# Altium PCB Akilli_Sensor_Dugumu.PcbDoc
Units mm, origin at the board's own origin, x right, y up, seen from the top; angles counter-clockwise.
Board outline 57.15 x 68.7 mm, 2 copper layers (Top Layer, Bottom Layer); 32 components, 34 nets, 172 pads, 44 vias.
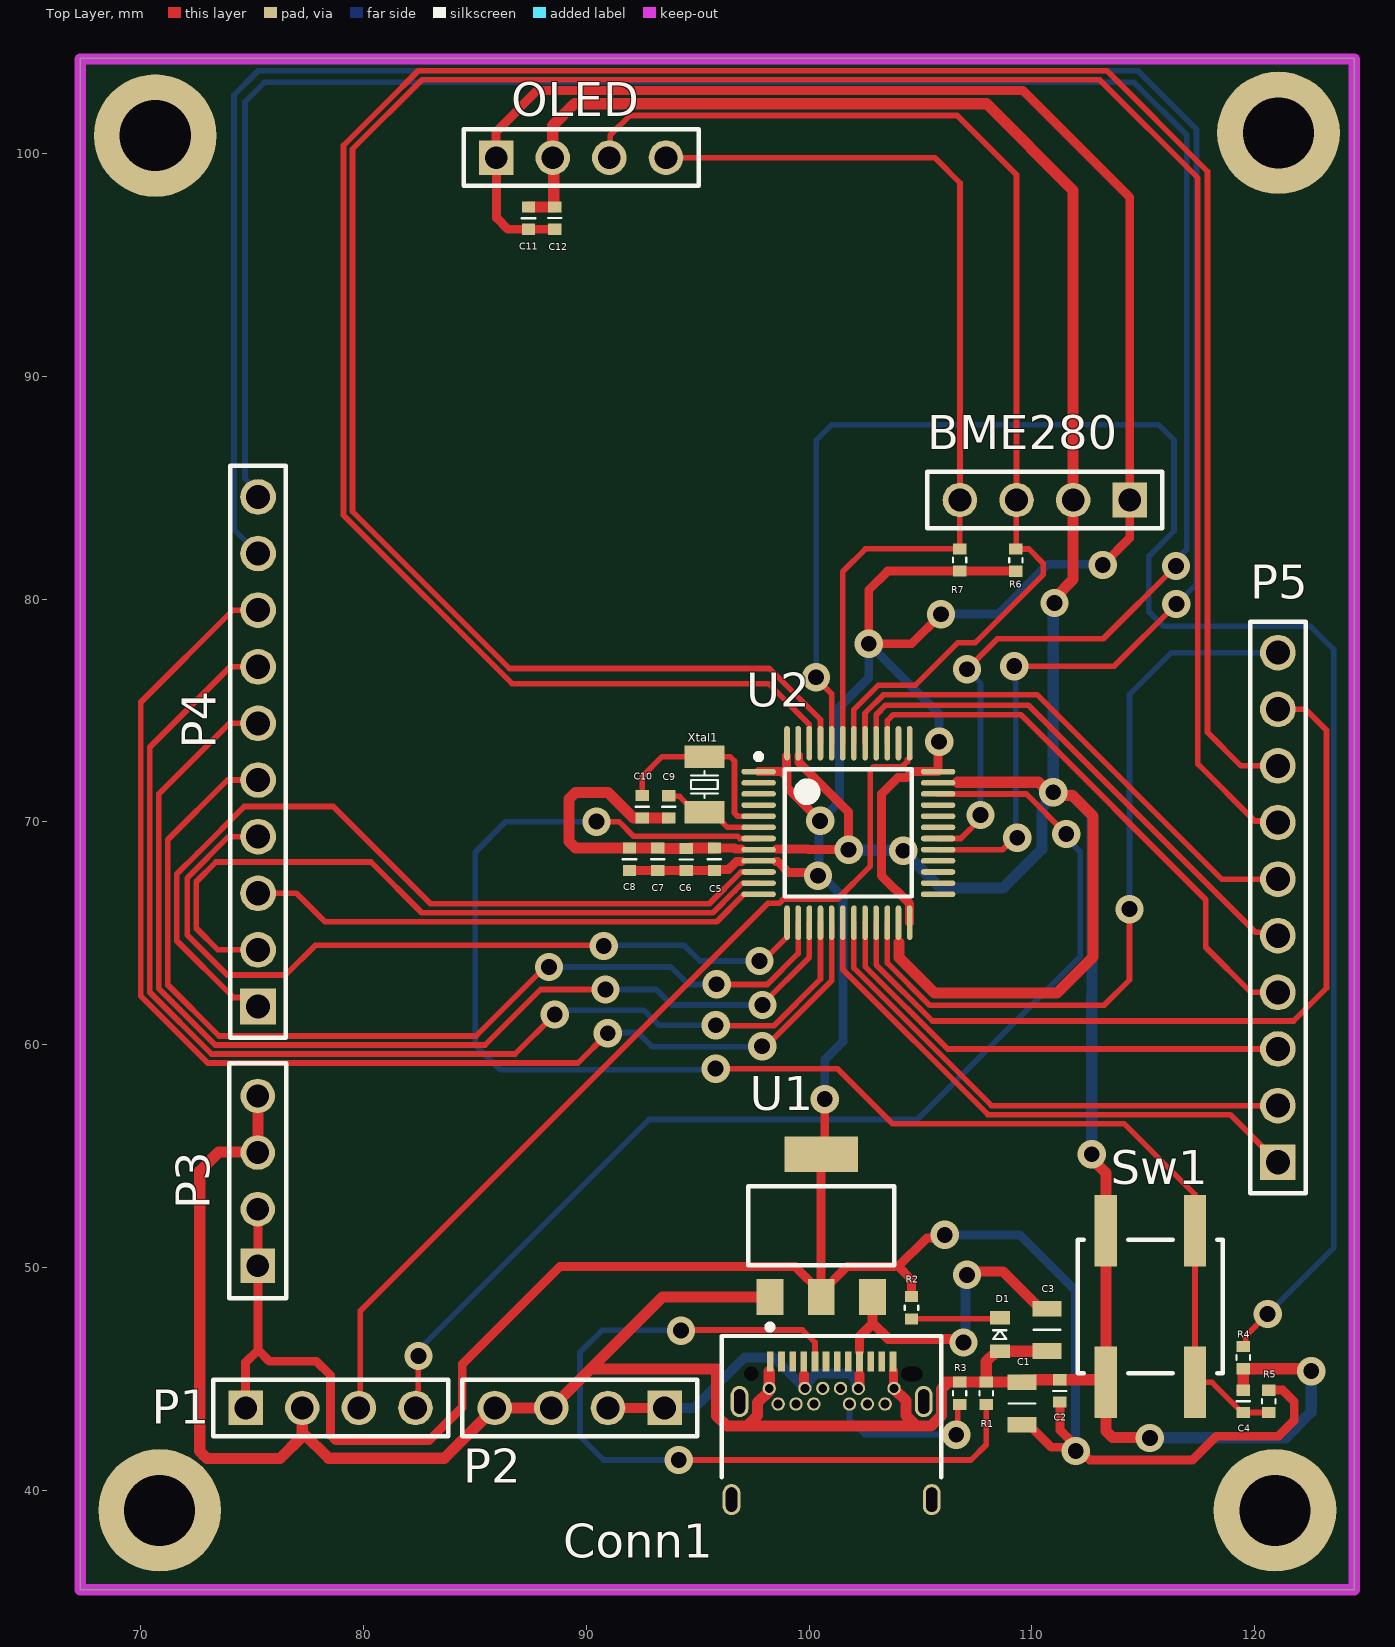
[diagram p0: Top Layer view]
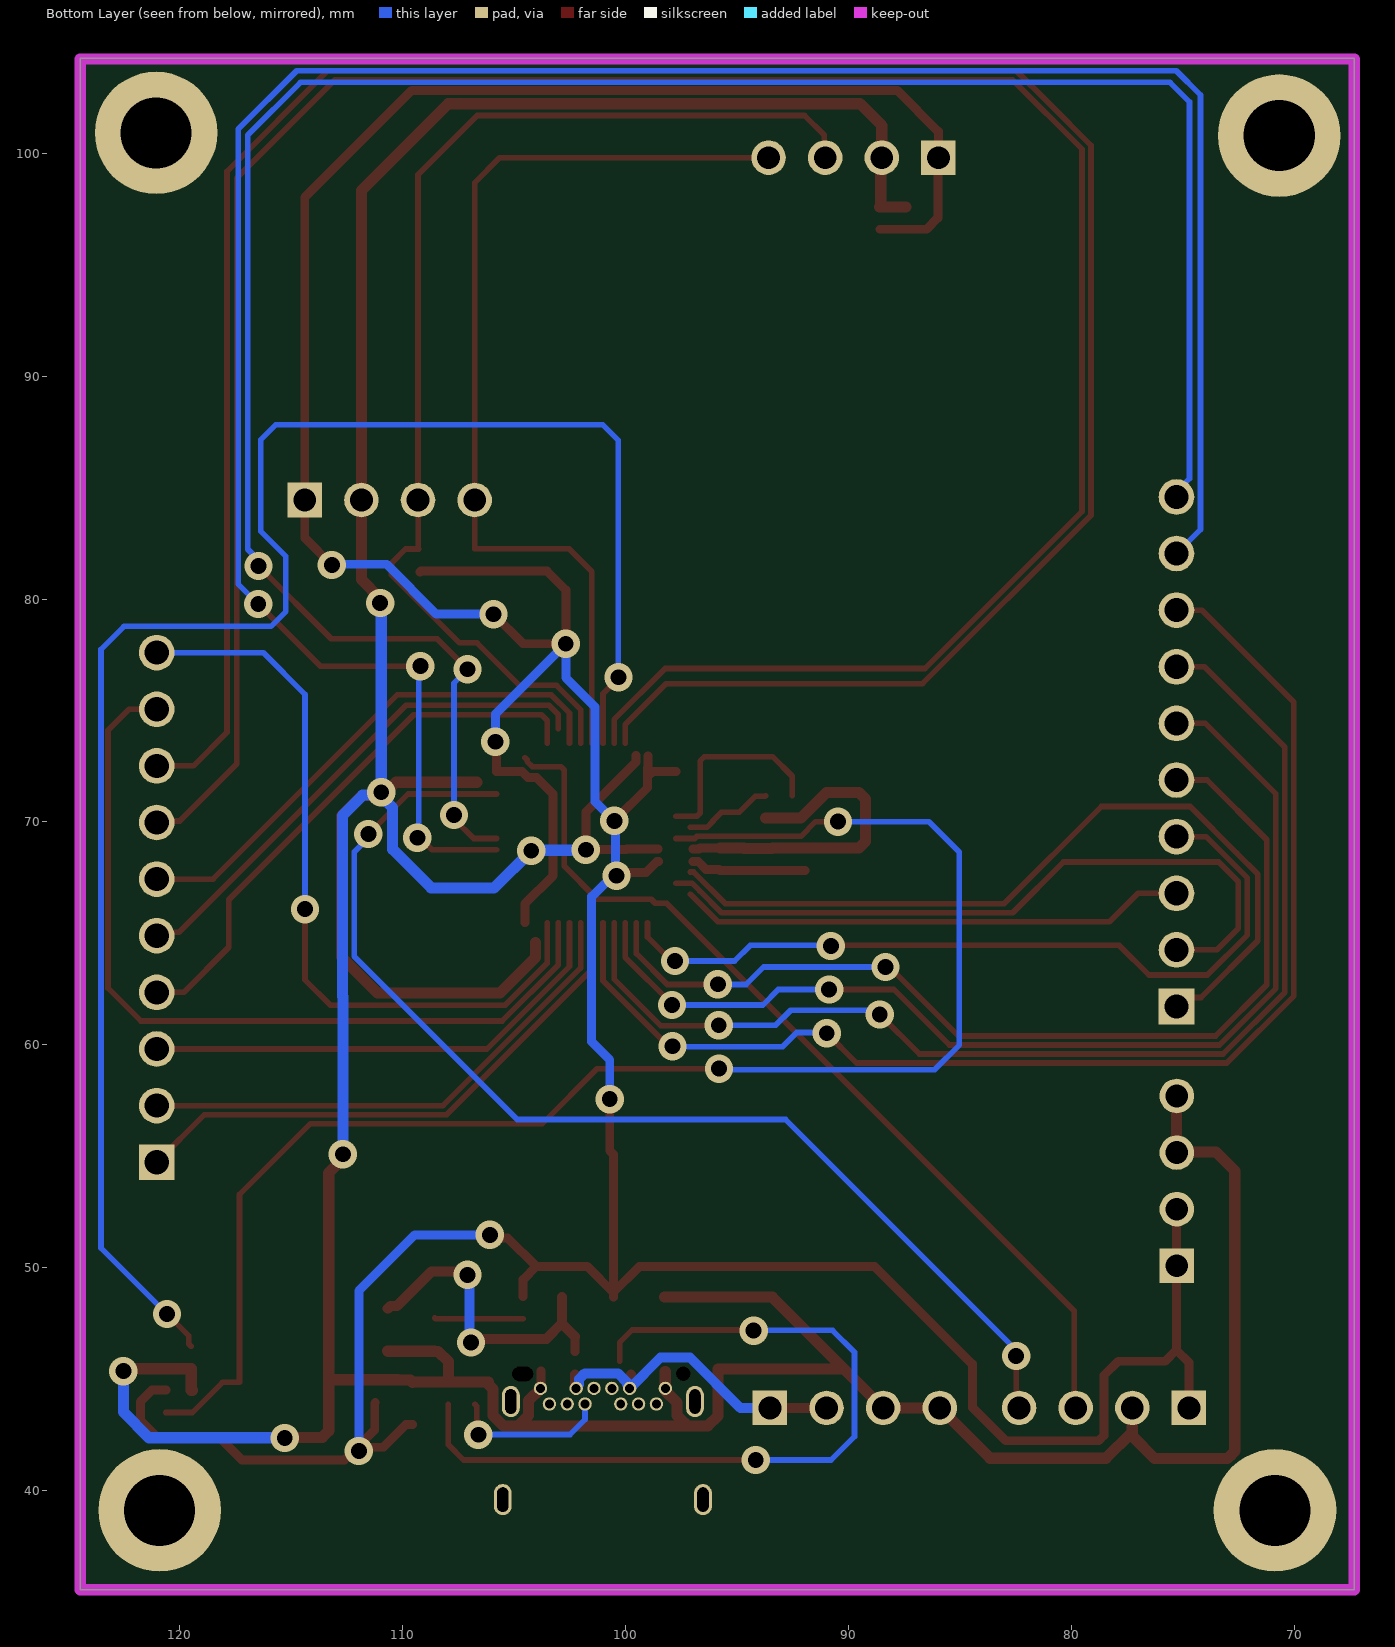
[diagram p1: Bottom Layer view, seen from below]
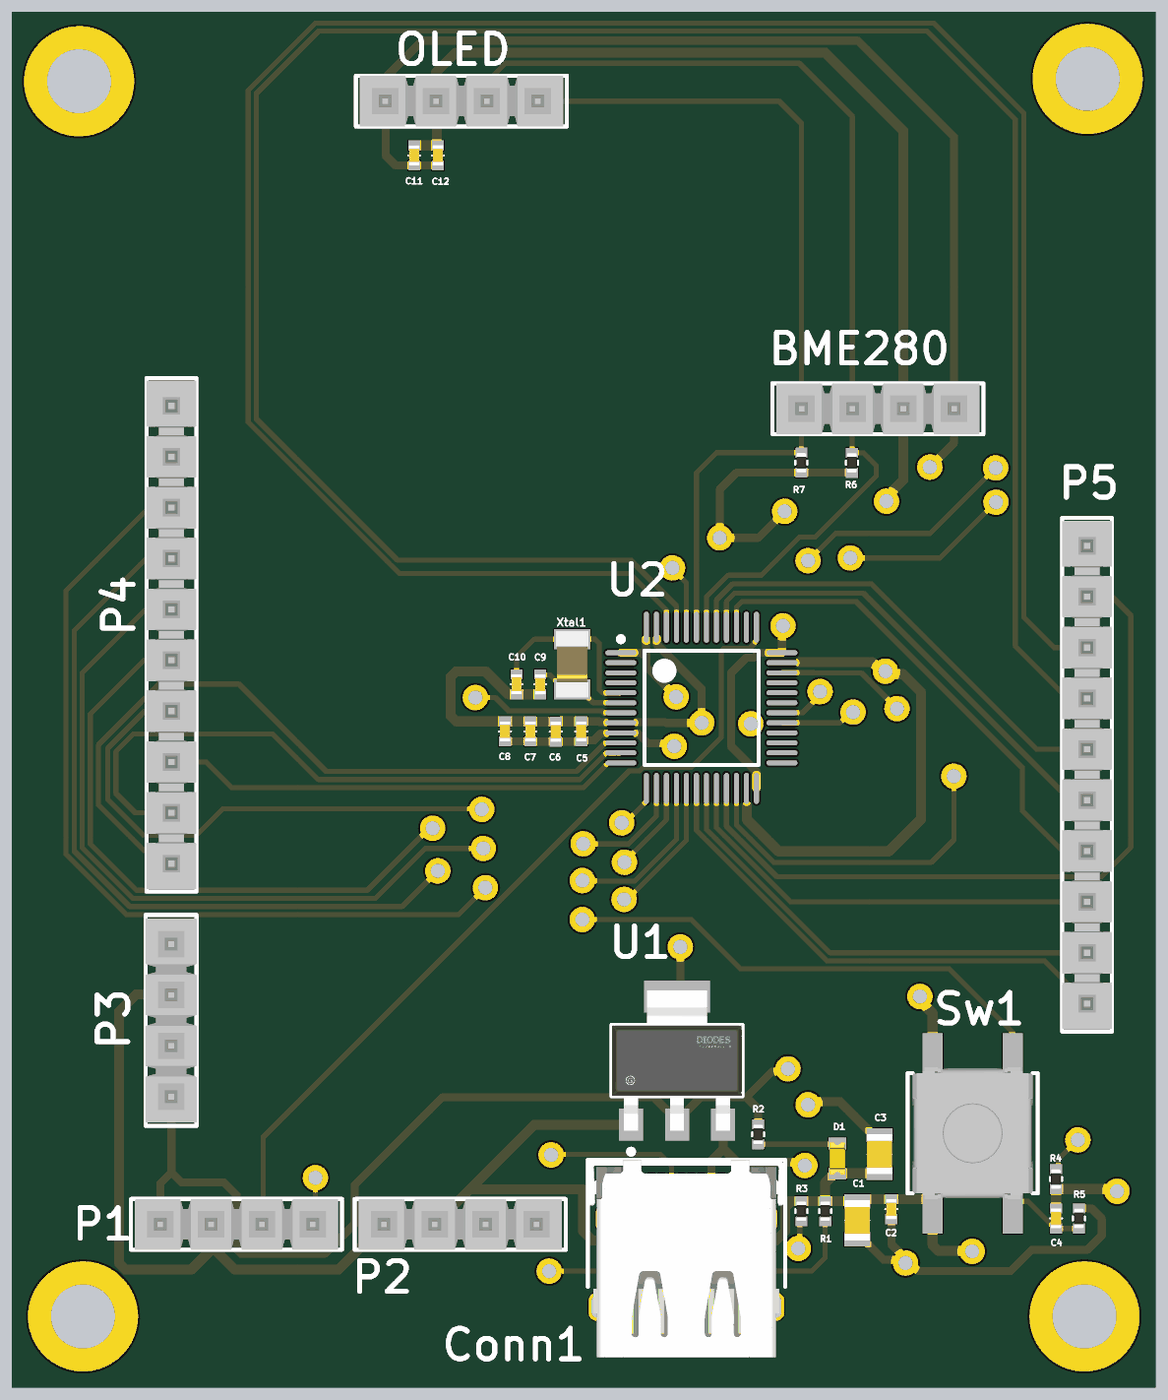
[diagram p2: 3D render of the assembled board from above, using the file's embedded part models]

## Layer stack, top to bottom
Top Solder: solder mask 0.0102, Solder Resist, Dk 3.5
Top Layer: signal copper 0.0356
Dielectric 1: dielectric 0.32, FR-4, Dk 4.8
Bottom Layer: signal copper 0.0356
Bottom Solder: solder mask 0.0102, Solder Resist, Dk 3.5

## Board outline
67.31,35.56 124.46,35.56 124.46,104.259 67.31,104.259

## Design rules (kind name [scope] priority, off if disabled: settings)
Clearance [All] p1: gap=0.15 ignorepadtopadclearanceinfootprint=TRUE
HoleSize [All] p1: absolutevalues=TRUE maxlimit=5 minlimit=0.025 maxpercent=80.000 minpercent=20.000
MinimumSolderMaskSliver [All] p1: minsoldermaskwidth=0.01
PolygonConnect [All] p1: connectstyle=Relief reliefconductorwidth=0.254 reliefentries=4 polygonreliefangle="90 Angle" airgapwidth=0.254
RoutingVias [All] p1: holewidth=0.711 width=1.27 viastyle="Through Hole" minholewidth=0.711 minwidth=1.27 maxholewidth=0.711 maxwidth=1.27
SilkToSolderMaskClearance [IsPad] p1: minsilkscreentomaskgap=0.1 clearancetoexposedcopper=TRUE
SolderMaskExpansion [All] p1: expansion=0.102 istentingtop=FALSE
SupplyNets "Schematic Supply Nets" [InNet('Gnd')] p1: voltage=0.000
Width [All] p1: maxlimit=0.5 minlimit=0.254 preferedwidth=0.254
27 further rules are at their usual default settings.

## Classes and differential pairs
component class 04_GPIO_Header: P2 P4
component class 03_Sensor_Display: BME280 C11 C12 R6 R7
component class 02_MCU: C4 C5 C6 C7 C8 C9 C10 P1 R4 R5 Sw1 U2 Xtal1
component class 01_Power: C1 C2 C3 Conn1 D1 R1 R2 R3

## Components (designator, comment, footprint, x,y, rotation, side; value= is the part's Value field where it differs from the comment)
BME280 "MTSW-104-07-G-S-170" SMTC-MTSW-104-07-X-S-170 114.39,84.444 r180 top
C1 "Capacitor_Ceramic" Capacitor_Ceramic_M2012_I0805 109.55,43.917 r90 top value=10uF
C2 "Capacitor_Ceramic" Capacitor_Ceramic_M1005_I0402 111.252,44.475 r90 top value=100nF
C3 "Capacitor_Ceramic" Capacitor_Ceramic_M2012_I0805 110.668,47.219 r270 top value=10uF
C4 "Capacitor_Ceramic" Capacitor_Ceramic_M1005_I0402 119.482,44.01 r90 top value=100nF
C5 "Capacitor_Ceramic" Capacitor_Ceramic_M1005_I0402 95.758,68.326 r90 top value=100nF
C6 "Capacitor_Ceramic" Capacitor_Ceramic_M1005_I0402 94.488,68.318 r90 top value=100nF
C7 "Capacitor_Ceramic" Capacitor_Ceramic_M1005_I0402 93.218,68.326 r90 top value=100nF
C8 "Capacitor_Ceramic" Capacitor_Ceramic_M1005_I0402 91.948,68.326 r90 top value=100nF
C9 "Capacitor_Ceramic" Capacitor_Ceramic_M1005_I0402 93.711,70.679 r270 top value=22pF
C10 "Capacitor_Ceramic" Capacitor_Ceramic_M1005_I0402 92.525,70.683 r270 top value=22pF
C11 "Capacitor_Ceramic" Capacitor_Ceramic_M1005_I0402 87.415,97.089 r90 top value=100nF
C12 "Capacitor_Ceramic" Capacitor_Ceramic_M1005_I0402 88.598,97.092 r90 top value=100nF
Conn1 "GCT, USB4056" "GCT, USB4056" 101.016,39.601 r0 top
D1 "Diode_Led" Diode_Smd_M1608_I0603_Green-Yellow 108.56,47.002 r90 top
OLED "MTSW-104-07-G-S-170" SMTC-MTSW-104-07-X-S-170 85.965,99.803 r0 top (schematic designator BME280)
P1 "MTSW-104-07-G-S-170" SMTC-MTSW-104-07-X-S-170 74.727,43.713 r0 top
P2 "MTSW-104-07-G-S-170" SMTC-MTSW-104-07-X-S-170 93.523,43.713 r180 top
P3 "MTSW-104-07-G-S-170" SMTC-MTSW-104-07-X-S-170 75.27,50.088 r90 top
P4 "PHT-110-01-L-S" SMTC-PHT-110-01-X-S 75.286,61.722 r90 top
P5 "PHT-110-01-L-S" SMTC-PHT-110-01-X-S 121.031,54.737 r90 top
R1 "Resistor" Resistor_Smd_M1005_I0402 107.95,44.374 r90 top value=4.87K
R2 "Resistor" Resistor_Smd_M1005_I0402 104.597,48.209 r270 top value=330R
R3 "Resistor" Resistor_Smd_M1005_I0402 106.756,44.374 r90 top value=4.87K
R4 "Resistor" Resistor_Smd_M1005_I0402 119.482,45.974 r270 top value=10K
R5 "Resistor" Resistor_Smd_M1005_I0402 120.625,44.01 r90 top value=10K
R6 "Resistor" Resistor_Smd_M1005_I0402 109.282,81.745 r90 top value=4.87K
R7 "Resistor" Resistor_Smd_M1005_I0402 106.755,81.752 r90 top value=4.87K
Sw1 "Tactile, SPST" "Tactile, SPST - Panasonic, EVQQ2" 115.316,48.26 r90 top
U1 "AZ1117CH-3.3TRG1" FP-SOT223-MFG 100.547,51.892 r90 top
U2 "STM32F103C8T6" STM-LQFP48_L 101.764,69.508 r0 top
Xtal1 "Crystal" "NDK, NX3215SA" 95.307,71.681 r90 top

## Footprints (in the part's own frame and the unit in brackets; to place one, negate y for a bottom-side part, rotate by r counter-clockwise, add the part's x,y. Pads: shape width x height; smd on the part's side, far side on the other; paste and mask are expansions set on the pad)
Capacitor_Ceramic_M1005_I0402 [mm] "Capacitor_Ceramic_M1005_I0402"
  rect 0.5x0.6 smd mask+0.05: 1(-0.5,0) 2(0.5,0)
  silkscreen extent 0,-0.3 0,0.3, body extent -0.6,-0.26 0.6,0.26, height 0.51
Capacitor_Ceramic_M2012_I0805 [mm] "Capacitor_Ceramic_M2012_I0805"
  rect 0.7x1.3 smd mask+0.05: 1(-0.95,0) 2(0.95,0)
  silkscreen extent 0,-0.6 0,0.6, body extent -1.09,-0.64 1.09,0.64, height 1.26
Diode_Smd_M1608_I0603_Green-Yellow [mm] "Diode_Smd_M1608_I0603_Green-Yellow"
  rect 0.6x0.9 smd mask+0.05: A(-0.75,0) C(0.75,0)
  silkscreen extent -0.2,-0.3 0.2,0.3, body extent -0.8,-0.4 0.8,0.4, height 0.7
FP-SOT223-MFG [mm]
  rect 1.6x1.2 smd paste+0 mask+0: 1(-3.2,2.3) 2(-3.2,0) 3(-3.2,-2.3)
  rect 1.6x3.3 smd paste+0 mask+0: 4(3.2,0)
  silkscreen extent -4.67,-3.27 1.78,3.27, body extent -4.1,-3.37 4.1,3.37, height 0.25
"GCT, USB4056" [mm] "GCT, USB4056"
  rect 0.3x0.9 smd mask+0.05: A1(-2.75,6.2) A2(-2.25,6.2) A3(-1.75,6.2) A4(-1.25,6.2) A5(-0.75,6.2) A6(-0.25,6.2) A7(0.25,6.2) A8(0.75,6.2) A9(1.25,6.2) A10(1.75,6.2) A11(2.25,6.2) A12(2.75,6.2)
  round 0.6 hole 0.4 mask+0.05: B1(2.8,4.99) B2(2.4,4.29) B3(1.6,4.29) B4(1.2,4.99) B5(0.8,4.29) B6(0.4,4.99) B7(-0.4,4.99) B8(-0.8,4.29) B9(-1.2,4.99) B10(-1.6,4.29) B11(-2.4,4.29) B12(-2.8,4.99)
  round 0 hole 0.65 unplated mask+0.05: Hole1(-3.6,5.64)
  round 0 hole 0.65 slot 0.95 at 0 deg unplated mask+0.05: Hole2(3.6,5.64)
  oval 0.8x1.4 hole 0.5 slot 1.1 at 90 deg mask+0.05: Shell1(-4.13,4.4) Shell2(4.13,4.4) Shell3(-4.49,0) Shell4(4.49,0)
  silkscreen extent -4.92,1 4.92,7.34, body extent -4.93,-2.52 4.92,7.35, height 3.33
"NDK, NX3215SA" [mm] "NDK, NX3215SA"
  rect 1x1.8 smd mask+0.05: 1(-1.25,0) 2(1.25,0)
  silkscreen extent -0.6,-0.6 0.6,0.6, body extent -1.65,-0.8 1.65,0.8, height 0.89
Resistor_Smd_M1005_I0402 [mm] "Resistor_Smd_M1005_I0402"
  rect 0.5x0.6 smd mask+0.05: 1(-0.5,0) 2(0.5,0)
  silkscreen extent -0.1,-0.3 0.1,0.3, body extent -0.5,-0.26 0.5,0.26, height 0.4
SMTC-MTSW-104-07-X-S-170 [mm] "Assembly .025\" [.64] SQ Post Terminal Strip, 1x4 Pins, Vertical, 2.54mm Pitch, Male"
  rect 1.55x1.55 hole 1.02: 1(0,0)
  round 1.55 hole 1.02: 2(2.54,0) 3(5.08,0) 4(7.62,0)
  silkscreen extent -1.46,-1.27 9.08,1.27, body extent -1.27,-1.27 8.89,1.27, height 6.86
SMTC-PHT-110-01-X-S [mm] "Press Fit Socket Assembly, 1x10 Pins, Vertical, 2.54mm Pitch, Male"
  rect 1.6x1.6 hole 1.081: 1(0,0)
  round 1.6 hole 1.081: 2(2.54,0) 3(5.08,0) 4(7.62,0) 5(10.16,0) 6(12.7,0) 7(15.24,0) 8(17.78,0) 9(20.32,0) 10(22.86,0)
  silkscreen extent -1.4,-1.24 24.26,1.24, body extent -1.26,-1.25 24.12,1.25, height 8.38
STM-LQFP48_L [mm] "QFP, 48-Leads, Body 7x7mm, Pitch 0.5mm, IPC High Density"
  oval 1.55x0.25 smd: 1(-4.025,2.75) 2(-4.025,2.25) 3(-4.025,1.75) 4(-4.025,1.25) 5(-4.025,0.75) 6(-4.025,0.25) 7(-4.025,-0.25) 8(-4.025,-0.75) 9(-4.025,-1.25) 10(-4.025,-1.75) 11(-4.025,-2.25) 12(-4.025,-2.75) 25(4.025,-2.75) 26(4.025,-2.25) 27(4.025,-1.75) 28(4.025,-1.25) 29(4.025,-0.75) 30(4.025,-0.25) 31(4.025,0.25) 32(4.025,0.75) 33(4.025,1.25) 34(4.025,1.75) 35(4.025,2.25) 36(4.025,2.75)
  oval 0.25x1.55 smd: 13(-2.75,-4.025) 14(-2.25,-4.025) 15(-1.75,-4.025) 16(-1.25,-4.025) 17(-0.75,-4.025) 18(-0.25,-4.025) 19(0.25,-4.025) 20(0.75,-4.025) 21(1.25,-4.025) 22(1.75,-4.025) 23(2.25,-4.025) 24(2.75,-4.025) 37(2.75,4.025) 38(2.25,4.025) 39(1.75,4.025) 40(1.25,4.025) 41(0.75,4.025) 42(0.25,4.025) 43(-0.25,4.025) 44(-0.75,4.025) 45(-1.25,4.025) 46(-1.75,4.025) 47(-2.25,4.025) 48(-2.75,4.025)
  silkscreen extent -4.15,-2.85 2.85,3.55, body extent -3.5,-3.5 3.5,3.5, height 1.6
"Tactile, SPST - Panasonic, EVQQ2" [mm] "Tactile, SPST - Panasonic, EVQQ2"
  rect 3.2x1 smd mask+0.05: A(-3.4,-2) A(3.4,-2) B(-3.4,2) B(3.4,2)
  silkscreen extent -3,-3.25 3,3.25, body extent -3.3,-3 3.3,3, height 3.1

## Part data
BME280 OLED P1 P2 P3: library part CMP-1024-00104-1, "Modified .025\" SQ Post Header, Through-hole, Vertical, -55 to 125 degC, 2.54 mm Pitch, 4-Pin, Male, RoHS", Manufacturer=Samtec, Temperature Range="-55 to 125 degC", ComponentLink1Description="Manufacturer URL", ComponentLink1URL=http://www.samtec.com, ComponentLink2Description=Datasheet, ComponentLink2URL=http://www.samtec.com/documents/webfiles/pdf/MTSW.PDF, ComponentLink3Description="Package Specification", ComponentLink3URL=http://www.samtec.com/documents/webfiles/cpdf/MTSW-XXX-XX-X-X-XXXX-XX-XXX-MKT1.pdf, DatasheetVersion=F-214, Mounting Technology=Through-hole, Orientation=Vertical, PackageDescription="Assembly .025\" [.64] SQ Post Terminal Strip", PackageReference=MTSW-104-07-X-S-170, PackageVersion="BI, 2/1987", PartNumber=MTSW-104-07-G-S-170, Pitch="2.54 mm", RoHS=True
C1 C3: "Cap, Cer, 10uF, 6.3V, M2012", Manufacturer=Samsung, Manufacturer Part Number=CL21A106MQFNNNE, Operating Temperature, Max=-55℃, Operating Temperature, Min=+85℃, Package=M2012, Supplier Part Number=1276-1298-1-ND, Temperature Coefficient=X5R, Tolerance=20%, Voltage=6.3V, Component Category=Capacitor, Component Type=Ceramic, ComponentLink1Description=Datasheet, ComponentLink1URL="E:\Altium\Datasheets\Capacitor\Samsung - Multi Layer Ceramic Capacitors.pdf", ComponentLink2Description="Supplier Link", ComponentLink2URL=https://www.digikey.com/en/products/detail/samsung-electro-mechanics/CL21A106MQFNNNE/3886956, Price, Max=0.0087, Price, Min=0.1, Quantity, Max=200000, Quantity, Min=1, Supplier=Digikey, Supplier Currency=$, Supplier Link=https://www.digikey.com/en/products/detail/samsung-electro-mechanics/CL21A106MQFNNNE/3886956
C2 C4 C5 C6 C7 C8 C11 C12: "Cap, Cer, 100nF, 6.3V, M1005", Manufacturer=Kyocera, Manufacturer Part Number=04026D104KAT4A, Operating Temperature, Max=-55℃, Operating Temperature, Min=+85℃, Package=M1005, Supplier Part Number=478-11504-1-ND, Temperature Coefficient=X5R, Tolerance=10%, Voltage=6.3V, Component Category=Capacitor, Component Type=Ceramic, ComponentLink1Description=Datasheet, ComponentLink1URL="E:\Altium\Datasheets\Capacitor\Kyocera - X5R.pdf", ComponentLink2Description="Supplier Link", ComponentLink2URL=https://www.digikey.com/en/products/detail/kyocera-avx/04026D104KAT4A/8107673, Price, Max=0.00189, Price, Min=0.1, Quantity, Max=250000, Quantity, Min=1, Supplier=Digikey, Supplier Currency=$, Supplier Link=https://www.digikey.com/en/products/detail/kyocera-avx/04026D104KAT4A/8107673
C9 C10: "Cap, Cer, 22pF, 25V, M1005", Manufacturer=Walsin, Manufacturer Part Number=0402N220J250CT, Operating Temperature, Max=-55℃, Operating Temperature, Min=+125℃, Package=M1005, Supplier Part Number=1292-1282-1-ND, Temperature Coefficient="C0G, NP0", Tolerance=5%, Voltage=25V, Component Category=Capacitor, Component Type=Ceramic, ComponentLink1Description=Datasheet, ComponentLink1URL="E:\Altium\Datasheets\Capacitor\Walsin - Multilayer Ceramic Capacitors.pdf", ComponentLink2Description="Supplier Link", ComponentLink2URL=https://www.digikey.com/en/products/detail/walsin-technology-corporation/0402N220J250CT/9354779, Price, Max=0.00177, Price, Min=0.1, Quantity, Max=250000, Quantity, Min=1, Supplier=Digikey, Supplier Currency=$, Supplier Link=https://www.digikey.com/en/products/detail/walsin-technology-corporation/0402N220J250CT/9354779
Conn1: "Conn, USB, TYPE-C", Manufacturer=GCT, Manufacturer Part Number=USB4056-03-A, Operating Temperature, Max=+85℃, Operating Temperature, Min=-25℃, Package="TH+SMT, Side", Supplier Part Number=2073-USB4056-03-ACT-ND, Component Category=Connector, Component Type=USB, ComponentLink1Description=Datasheet, ComponentLink1URL="E:\Altium\Datasheets\Connector - USB\GCT, USB4056.pdf", ComponentLink2Description="Supplier Link", ComponentLink2URL=https://www.digikey.com/en/products/detail/gct/USB4056-03-A/14638038, Price, Max=0.44463, Price, Min=0.97, Quantity, Max=10000, Quantity, Min=1, Supplier=Digikey, Supplier Currency=$, Supplier Link=https://www.digikey.com/en/products/detail/gct/USB4056-03-A/14638038
D1: "Diode, Led, Green-Yellow, 2.2V, 20mA, M1608", Current=20mA, Manufacturer=Rohm, Manufacturer Part Number=SML-D12M1WT86, Operating Temperature, Max=+85℃, Operating Temperature, Min=-40℃, Package=M1608, Supplier Part Number=SML-D12M1WT86CT-ND, Voltage=2.2V, Component Category=Diode, Component Type=Led, ComponentLink1Description=Datasheet, ComponentLink1URL="E:\Altium\Datasheets\Diode\Rohm, SML-D12x1 Series.pdf", ComponentLink2Description="Supplier Link", ComponentLink2URL=https://www.digikey.com/en/products/detail/rohm-semiconductor/SML-D12M1WT86/5843856, Price, Max=0.02838, Price, Min=0.25, Quantity, Max=75000, Quantity, Min=1, Supplier=Digikey, Supplier Currency=$, Supplier Link=https://www.digikey.com/en/products/detail/rohm-semiconductor/SML-D12M1WT86/5843856
P4 P5: library part CMP-1024-00195-1, "Press Fit Header, Through-hole, Vertical, -55 to 125 degC, 2.54 mm Pitch, 10-Pin, Male, RoHS", Manufacturer=Samtec, Temperature Range="-55 to 125 degC", ComponentLink1Description="Manufacturer URL", ComponentLink1URL=http://www.samtec.com, ComponentLink2Description=Datasheet, ComponentLink2URL=http://www.samtec.com/documents/webfiles/pdf/pht.pdf, ComponentLink3Description="Package Specification", ComponentLink3URL=http://www.samtec.com/documents/webfiles/cpdf/PHT-1XX-XX-X-X-XXX-MKT.pdf, DatasheetVersion=F-214, Mounting Technology=Through-hole, Orientation=Vertical, PackageDescription=".100 Press Fit Socket Assembly", PackageReference=PHT-110-01-X-S, PackageVersion="J, 9/2009", PartNumber=PHT-110-01-L-S, Pitch="2.54 mm", RoHS=True
R1 R3 R6 R7: "Res, 4.87K, 1%, M1005", Manufacturer=Yageo, Manufacturer Part Number=RC0402FR-074K87L, Operating Temperature, Max=-55℃, Operating Temperature, Min=+155℃, Package=M1005, Supplier Part Number=YAG3175CT-ND, Tolerance=1%, Component Category=Resistor, Component Type="Fixed Value", ComponentLink1Description=Datasheet, ComponentLink1URL="E:\Altium\Datasheets\Resistor\Yageo - RC_L Series.pdf", ComponentLink2Description="Supplier Link", ComponentLink2URL=https://www.digikey.com/en/products/detail/yageo/RC0402FR-074K87L/5281035, Price, Max=0.00129, Price, Min=0.1, Quantity, Max=100000, Quantity, Min=1, Supplier=Digikey, Supplier Currency=$, Supplier Link=https://www.digikey.com/en/products/detail/yageo/RC0402FR-074K87L/5281035
R2: "Res, 330R, 1%, M1005", Manufacturer=Yageo, Manufacturer Part Number=RC0402FR-07330RL, Operating Temperature, Max=-55℃, Operating Temperature, Min=+155℃, Package=M1005, Supplier Part Number=311-330LRCT-ND, Tolerance=1%, Component Category=Resistor, Component Type="Fixed Value", ComponentLink1Description=Datasheet, ComponentLink1URL="E:\Altium\Datasheets\Resistor\Yageo - RC_L Series.pdf", ComponentLink2Description="Supplier Link", ComponentLink2URL=https://www.digikey.com/en/products/detail/yageo/RC0402FR-07330RL/726594, Price, Max=0.00129, Price, Min=0.1, Quantity, Max=100000, Quantity, Min=1, Supplier=Digikey, Supplier Currency=$, Supplier Link=https://www.digikey.com/en/products/detail/yageo/RC0402FR-07330RL/726594
R4 R5: "Res, 10K, 1%, M1005", Manufacturer=Yageo, Manufacturer Part Number=RC0402FR-0710KP, Operating Temperature, Max=-55℃, Operating Temperature, Min=+155℃, Package=M1005, Supplier Part Number=YAG1249CT-ND, Tolerance=1%, Component Category=Resistor, Component Type="Fixed Value", ComponentLink1Description=Datasheet, ComponentLink1URL="E:\Altium\Datasheets\Resistor\Yageo - RC_L Series.pdf", ComponentLink2Description="Supplier Link", ComponentLink2URL=https://www.digikey.com/en/products/detail/yageo/RC0402FR-0710KP/4935264, Price, Max=0.00282, Price, Min=0.1, Quantity, Max=100000, Quantity, Min=1, Supplier=Digikey, Supplier Currency=$, Supplier Link=https://www.digikey.com/en/products/detail/yageo/RC0402FR-0710KP/4935264
Sw1 Xtal1: "*", Operating Temperature, Max=+*℃, Operating Temperature, Min=-*℃, ComponentLink1Description=Datasheet, ComponentLink2Description="Supplier Link"
  Sw1: Component Category=Switch, Component Type=Tactile
  Xtal1: Component Category=Crystal, Component Type=Crystal
U1: library part CMP-12756-000028-1, "IC REG LINEAR 3.3V 800MA SOT223", Case/Package=SOT-223, Dropout Voltage=1.2V, Max Operating Temperature=125°C, Max Output Current=1.35A, Max Input Voltage=15V, Min Current Limit=1A, Min Operating Temperature=-20°C, Output Current=800mA, Output Voltage=3.3V, Package Quantity=4000, Power Supply Rejection Ratio (PSRR)=70dB, Quiescent Current=6mA, Reference Voltage=1.262V, Accuracy=1%, Height=1.7mm, Lead Free="Lead Free", Length=6.7mm, Mount="Surface Mount", Number of Outputs=1, Number of Pins=4, Number of Regulators=1, Output Type=Fixed, Packaging="Tape and Reel", Polarity=Positive, Width=3.7mm
U2: library part CMP-0237-00215-3, "ARM Cortex-M3 32-bit MCU, 64 KB Flash, 20 KB Internal RAM, 37 I/Os, 48-pin LQFP, -40 to 85 degC, Tray", Operating Frequency(F) (Processor speed) (MHz)=72, Supply Voltage(Vcc) min (V)=2, I/Os (High Current)=37, A/D Converter="2x12-bit (10 Channel)", ComponentLink1Description="Manufacturer URL", ComponentLink1URL=http://www.st.com/web/en/home.html, ComponentLink2Description=Datasheet, ComponentLink2URL=http://www.st.com/st-web-ui/static/active/en/resource/technical/document/datasheet/CD00161566.pdf, ComponentLink3Description="Package Specification", ComponentLink3URL=http://www.st.com/st-web-ui/static/active/en/resource/technical/document/datasheet/DM00058181.pdf, Core="ARM Cortex-M3", DatasheetVersion="Rev. 16", FLASH Size (Prog) (kB)=64, Mounting Technology="Surface Mount", PackageDescription="48-Pin Low Profile Quad Flat Package, 7 x 7 mm Body, 0.5 mm Pitch", PackageReference=LQFP48, PackageVersion="Rev. 6, 06/2013", Packing=Tray, PartNumber=STM32F103C8T6, Internal RAM Size (kB)=20

## Free pads (board coordinates)
  round 5.5 hole 3.2 unplated: 1(70.672,100.794) 2(70.866,39.116) 3(121.062,100.911) 4(120.904,39.116)

## Via types
v1: diameter 1.27, hole 0.711, Top Layer to Bottom Layer, 44 vias

## Nets (pads, with @x,y where several pads share a name; then routed paths per layer and width w, separated by ;. In a path a pad name is that pad's centre, name@x,y a point inside that pad or via, vN(x,y) a via of type N, cw(c..) or ccw(c..) an arc to the next point about the centre after c; other vN are vias at no path point)
3V3: BME280.1 C1.1 C2.1 C5.1 C6.1 C7.1 C8.1 C11.1 C12.1 OLED.1 P1.1 P3.1 P3.2 R2.1 R5.2 R6.1 R7.1 U1.2 U1.4 U2.1 U2.9 U2.24 U2.36 U2.48 | length 218.7
  Top Layer w0.4: P1.1 74.727,45.755 75.286,46.313 ; P3.2@75.286,52.654 75.286,46.313 ; C12.1@88.596,96.59 87.417,96.59 C11.1 86.496,96.589 85.987,97.097 85.987,99.781 OLED.1 85.965,100.967 87.819,102.821 109.588,102.821 114.39,98.019 BME280.1 114.39,82.743 v1(113.176,81.528) ; C8.1 C7.1 93.222,67.822 94.484,67.822 C6.1 94.492,67.822 C5.1@95.754,67.822 ; C5.1 95.808,67.876 96.393,67.876 96.75,68.233 U2.9@96.98,68.233 ; U2.1 98.78,72.258 99.014,72.023 ; U2.9@98.511,68.233 98.586,68.233 99.077,67.742 100.254,67.742 v1(100.406,67.589) ; U2.48@98.989,72.958 98.989,72.458 99.014,72.433 99.014,72.023 ; v1(100.501,70.052) 99.014,71.539 99.014,72.023 ; U1.2 U1.2@100.547,48.892 ; v1(100.707,57.567) 100.707,55.252 U1.4 U1.2@100.547,48.892 ; U2.24 104.514,66.324 103.246,67.593 103.246,71.253 103.997,72.004 104.378,72.004 104.632,72.258 U2.36 105.789,73.551 v1(105.838,73.6) ; R2.1 104.597,49.473 104.009,50.061 ; v1(105.925,79.322) 104.599,77.996 v1(102.68,77.996) 102.68,80.407 103.524,81.252 R7.1 109.182,81.252 109.223,81.211 R6.1@109.223,81.203 ; v1(106.088,51.478) 105.945,51.336 105.284,51.336 104.009,50.061 ; C1.1 109.85,42.967 110.867,41.949 v1@111.797,41.949 ; C2.1@111.227,43.95 111.252,43.925 111.252,42.73 v1@111.963,42.018 ; v1(111.963,41.783) 112.199,41.783 112.599,41.382 117.212,41.382 118.273,42.443 121.056,42.443 121.768,43.155 121.768,43.993 121.25,44.51 R5.2 ; 75.286,46.313 75.79,45.809 77.899,45.809 78.538,45.169 78.538,42.477 78.773,42.243 82.945,42.243 84.443,43.741 84.443,45.678 88.819,50.053 99.386,50.053 U1.2@100.547,48.892 ; U1.2@100.547,48.892 101.717,50.061 104.009,50.061
  Bottom Layer w0.4: v1(100.707,57.567) 100.707,59.334 101.521,60.147 101.521,66.653 100.584,67.589 v1(100.406,67.589) 100.454,67.637 100.454,70.004 v1(100.501,70.052) 101.374,70.924 101.374,75.165 102.68,76.472 v1(102.68,77.996) 105.838,74.838 v1(105.838,73.6) ; v1(105.925,79.322) 105.931,79.328 108.482,79.328 110.715,81.56 113.143,81.56 v1(113.176,81.528) ; v1(106.088,51.478) 109.454,51.478 111.963,48.969 v1(111.963,41.783)
5V: C3.1 Conn1.A4 Conn1.A9 Conn1.B4 Conn1.B9 P2.1 P2.2 U1.3 | length 29.4
  Top Layer w0.4: 102.266,46.251 102.266,46.908
  Top Layer w0.45: P2.2 P2.1 ; 99.766,45.216 99.766,44.682 99.816,44.632 Conn1.B9 ; Conn1.B4 102.216,44.632 102.266,44.682 102.266,45.213 ; 102.266,46.908 102.847,47.489 ; U1.3 102.847,47.519 103.551,46.816 106.257,46.816 106.265,46.808 106.774,46.808 v1(106.931,46.651) ; v1(107.09,49.684) 107.247,49.841 108.695,49.841 110.243,48.294 110.543,48.294 C3.1
  Bottom Layer w0.45: P2.1 94.853,43.713 97.111,45.971 98.436,45.971 Conn1.B9 99.816,44.632 99.941,44.757 99.941,44.871 100.336,45.266 101.827,45.266 102.091,45.003 102.091,44.757 102.216,44.632 Conn1.B4 ; v1(106.931,46.651) 107.011,46.731 107.011,49.605 v1(107.09,49.684)
Gnd: BME280.2 C1.2 C2.2 C3.2 C4.2 C5.2 C6.2 C7.2 C8.2 C9.2 C10.2 C11.2 C12.2 Conn1.A1 Conn1.A12 Conn1.B1 Conn1.B12 D1.A OLED.2 P1.2 P2.3 P2.4 P3.3 P3.4 R1.2 R3.2 R4.2 Sw1.B U1.1 U2.8 U2.23 U2.35 U2.47 | length 249.1
  Top Layer w0.4: C5.2 96.658,68.826 96.701,68.783 U2.8@96.97,68.783 ; 98.537,68.789 99.942,68.789 99.973,68.758 v1(101.78,68.758) 101.78,70.441 99.539,72.681 U2.47@99.539,72.986 ; Conn1.A12@103.791,45.363 103.791,44.616 Conn1.B1
  Top Layer w0.5: P3.4@75.286,57.734 75.286,55.194 73.521,55.194 72.669,54.343 72.669,41.97 72.669,41.78 72.678,41.755 72.815,41.618 ccw(c73.169,41.97) 72.843,41.591 72.997,41.453 76.276,41.453 77.267,42.443 P1.2 ; 77.308,42.598 78.448,41.459 83.648,41.459 P2.4 P2.3 90.195,45.466 ; C11.2 88.545,97.589 C12.2@88.548,97.592 ; C12.2 88.552,97.592 88.552,99.757 OLED.2 88.505,101.236 89.49,102.221 107.952,102.221 111.85,98.323 BME280.2 111.85,80.873 111.01,80.033 v1(111.01,79.825) ; C7.2 C8.2 89.523,68.826 89.23,69.119 89.23,71.036 89.523,71.329 90.977,71.329 92.123,70.183 C10.2 92.575,70.183 92.579,70.179 C9.2 ; C7.2@93.226,68.826 93.414,68.826 93.422,68.818 C6.2 94.684,68.818 94.692,68.826 C5.2 ; 98.216,45.351 Conn1.B12 98.196,44.572 98.196,44.462 97.686,43.951 97.686,43.37 97.34,43.024 97.564,43.024 97.441,42.901 ; U1.1 93.421,48.692 90.195,45.466 ; Conn1.B1 103.816,44.572 104.346,44.042 104.346,43.37 104.814,42.901 ; 104.041,64.597 104.041,63.922 105.627,62.336 111.124,62.336 112.738,63.95 112.738,70.275 111.826,71.187 111.107,71.187 v1(110.96,71.335) 110.751,71.335 110.301,71.785 106.676,71.785 ; 106.158,44.874 106.255,44.874 ; C3.2 110.659,46.26 108.568,46.26 D1.A 108.41,46.252 107.95,45.792 R1.2 ; v1(112.681,55.093) 112.681,54.884 113.316,54.25 113.316,51.66 Sw1.B@113.316,44.86 ; v1(115.291,42.367) 115.268,42.389 113.609,42.389 113.316,42.682 Sw1.B@113.316,44.86 ; C4.2@119.432,44.51 C4.2 R4.2 122.42,45.474 v1(122.53,45.364) ; 90.195,45.466 95.86,45.466 95.86,43.357 96.315,42.901 97.441,42.901 ; 97.441,42.901 104.814,42.901 ; 104.814,42.901 105.477,42.901 105.946,43.37 105.946,44.564 106.255,44.874 ; 106.255,44.874 R3.2 R1.2 ; R1.2 109.543,44.874 C1.2 109.65,44.967 110.193,44.967 110.202,44.975 C2.2 113.201,44.975 Sw1.B@113.316,44.86
  Bottom Layer w0.5: v1(101.78,68.758) 101.805,68.732 104.205,68.732 v1(104.231,68.707) 105.894,67.044 108.713,67.044 110.449,68.779 110.449,70.657 110.96,71.168 v1(110.96,71.335) ; v1(111.01,79.825) 110.96,79.774 v1(110.96,71.335) ; v1(112.681,55.093) 112.681,62.163 112.697,62.178 112.697,70.293 111.787,71.203 111.091,71.203 v1(110.96,71.335) ; v1(115.291,42.367) 115.298,42.375 121.379,42.375 122.53,43.525 v1(122.53,45.364)
NetC4_1: C4.1 R5.1 Sw1.A U2.7 | length 69.6
  Top Layer w0.254: v1(90.471,70.018) 91.471,70.018 92.136,69.353 96.806,69.353 96.899,69.26 97.091,69.26 97.093,69.258 U2.7 ; v1(95.811,58.934) 101.268,58.934 103.733,56.469 114.133,56.469 117.316,53.286 117.316,51.66 117.316,44.86 118.082,44.86 119.432,43.51 C4.1 ; C4.1@119.502,43.51 R5.1
  Bottom Layer w0.254: v1(90.471,70.018) 86.398,70.018 85.025,68.645 85.025,59.993 86.129,58.889 95.766,58.889 v1(95.811,58.934)
NetC9_1: C9.1 U2.6 Xtal1.1 | length 4
  Top Layer w0.254: C9.1 93.741,71.15 94.188,71.15 94.907,70.431 95.707,70.431 96.08,70.058 96.08,70.031 96.351,69.76 U2.6@97.091,69.76
NetC10_1: C10.1 U2.5 Xtal1.2 | length 8.9
  Top Layer w0.254: C10.1 92.525,72.049 93.407,72.931 96.463,72.931 96.655,72.739 96.655,70.407 96.804,70.258 U2.5
NetConn1_A5: Conn1.A5 R1.1 | length 36.6
  Top Layer w0.254: v1(94.158,41.377) 107.262,41.377 107.95,42.065 R1.1 ; v1(94.255,47.184) 94.279,47.208 99.705,47.208 100.266,46.647 Conn1.A5
  Bottom Layer w0.254: v1(94.158,41.377) 90.781,41.377 89.729,42.429 89.729,46.214 90.708,47.193 94.246,47.193 v1(94.255,47.184)
NetConn1_B5: Conn1.B5 R3.1 | length 7
  Top Layer w0.254: v1(106.603,42.512) 106.679,42.589 106.679,43.797 R3.1
  Bottom Layer w0.254: Conn1.B5 101.816,43.193 102.487,42.522 v1@106.435,42.522
NetD1_C: D1.C R2.2 | length 4
  Top Layer w0.254: R2.2 108.517,47.709 D1.C
NetR4_1: R4.1 U2.44 | length 80.6
  Top Layer w0.254: v1(100.316,76.494) 100.316,76.453 101.014,75.755 U2.44 ; R4.1 119.59,46.583 119.59,46.946 v1(120.574,47.93)
  Bottom Layer w0.254: v1(100.316,76.494) 100.333,76.511 100.333,87.131 101.029,87.827 115.685,87.827 116.371,87.141 116.371,83.049 115.238,81.916 115.238,79.448 115.91,78.776 122.501,78.776 123.533,77.744 123.533,50.889 v1(120.574,47.93)
PA0: P4.1 U2.10 | length 37
  Top Layer w0.254: P4.1 74.88,62.127 74.178,62.127 71.636,64.669 71.636,66.786 71.637,66.788 71.637,67.662 72.589,68.614 74.668,70.693 78.655,70.693 83.017,66.331 95.523,66.331 96.947,67.756 U2.10@97.091,67.756
PA1: P4.2 U2.11 | length 32.4
  Top Layer w0.254: P4.2 73.481,64.262 72.509,65.234 72.509,67.32 73.39,68.201 74.864,68.201 80.354,68.201 82.628,65.927 95.691,65.927 96.687,66.923 ; 96.687,66.924 97.021,67.258 U2.11
PA2: P4.3 U2.12 | length 22.8
  Top Layer w0.254: P4.3 77.008,66.802 78.287,65.523 95.858,65.523 U2.12@97.091,66.756
PA3: P4.4 U2.13 | length 36.1
  Top Layer w0.254: P4.4 73.96,69.342 72.105,67.487 72.105,64.931 73.903,63.133 76.519,63.133 77.853,64.467 90.758,64.467 v1(90.79,64.434) ; v1(97.78,63.762) 97.939,63.762 99.014,64.837 U2.13
  Bottom Layer w0.254: v1(90.79,64.434) 90.823,64.467 94.404,64.467 95.109,63.762 v1(97.78,63.762)
PA4: P4.5 U2.14 | length 44.5
  Top Layer w0.254: P4.5 73.913,71.882 71.232,69.201 71.232,62.695 73.53,60.397 85.067,60.397 88.163,63.494 v1(88.337,63.494) ; v1(95.857,62.718) 95.868,62.707 98.128,62.707 99.514,64.093 U2.14
  Bottom Layer w0.254: v1(88.337,63.494) 93.806,63.494 94.592,62.707 95.847,62.707 v1(95.857,62.718)
PA5: P4.6 U2.15 | length 48.5
  Top Layer w0.254: P4.6 73.99,74.422 70.828,71.26 70.828,62.528 73.362,59.993 85.473,59.993 87.963,62.483 v1(90.868,62.483) ; v1(97.916,61.794) 97.916,61.827 100.014,63.925 U2.15
  Bottom Layer w0.254: v1(90.868,62.483) 93.15,62.483 93.84,61.794 v1(97.916,61.794)
PA6: P4.7 U2.16 | length 53.1
  Top Layer w0.254: P4.7 74.034,76.962 70.424,73.352 70.424,62.361 73.195,59.589 86.818,59.589 v1(88.595,61.366) ; v1(95.818,60.882) 95.847,60.853 98.415,60.853 100.514,62.952 U2.16
  Bottom Layer w0.254: v1(88.595,61.366) 88.787,61.558 92.591,61.558 93.267,60.882 v1(95.818,60.882)
PA7: P4.8 U2.17 | length 57
  Top Layer w0.254: P4.8 74.154,79.502 70.02,75.369 70.02,62.193 73.028,59.186 89.632,59.186 v1(90.971,60.524) ; v1(97.898,59.941) 98.075,59.941 101.014,62.88 U2.17
  Bottom Layer w0.254: v1(90.971,60.524) 91.003,60.556 92.317,60.556 92.949,59.925 97.881,59.925 v1(97.898,59.941)
PA8: P4.9 U2.29 | length 107.4
  Top Layer w0.254: U2.29 108.683,68.758 109.219,69.293 v1(109.34,69.293) ; v1(109.205,76.991) 113.696,76.991 v1(116.48,79.775)
  Bottom Layer w0.254: P4.9 74.209,83.119 74.209,102.616 75.295,103.702 114.753,103.702 117.38,101.075 117.38,80.675 v1(116.48,79.775) ; v1(109.205,76.991) 109.272,76.924 109.272,69.361 v1(109.34,69.293)
PA9: P4.10 U2.30 | length 101.6
  Top Layer w0.254: U2.30 106.81,69.258 107.693,70.14 v1(107.693,70.316) ; v1(107.089,76.853) 108.453,78.217 113.2,78.217 v1(116.468,81.485)
  Bottom Layer w0.254: P4.10 75.286,84.816 74.698,85.404 74.698,102.306 75.573,103.181 114.583,103.181 116.945,100.82 116.945,82.237 116.468,81.76 v1(116.468,81.485) ; v1(107.089,76.853) 107.089,76.833 107.693,76.23 v1(107.693,70.316)
PB0: P5.1 U2.18 | length 25.2
  Top Layer w0.254: U2.18@101.512,65.481 101.514,65.479 101.514,63.382 108.023,56.873 118.895,56.873 P5.1
PB1: P5.2 U2.19 | length 23.6
  Top Layer w0.254: U2.19 102.014,63.453 108.19,57.277 P5.2
PB2: P5.3 U2.20 | length 22
  Top Layer w0.254: U2.20 102.516,65.481 102.516,63.523 106.222,59.817 P5.3
PB3: P5.4 U2.39 | length 25.1
  Top Layer w0.254: U2.39 103.514,74.553 103.769,74.808 109.504,74.808 117.799,66.512 117.799,64.378 119.82,62.357 P5.4
PB4: P5.5 U2.40 | length 23.1
  Top Layer w0.254: U2.40@103.014,74.181 103.014,74.814 103.437,75.236 109.849,75.236 120.029,65.057 120.871,65.057 P5.5
PB5: P5.6 U2.41 | length 23.6
  Top Layer w0.254: U2.41 102.514,74.885 103.331,75.702 110.246,75.702 118.51,67.437 P5.6
PB8: P5.7 U2.45 | length 114.2
  Top Layer w0.254: U2.45 100.514,74.593 98.221,76.886 86.567,76.886 79.524,83.93 79.524,100.185 82.637,103.298 113.038,103.298 117.445,98.891 117.445,72.598 119.999,70.044 120.964,70.044 P5.7
PB9: P5.8 U2.46 | length 113.2
  Top Layer w0.254: U2.46 100.014,74.369 98.176,76.207 86.675,76.207 79.12,83.763 79.12,100.352 81.016,102.249 82.47,103.702 113.363,103.702 117.877,99.188 117.877,74.024 119.384,72.517 P5.8
PB10: P5.9 U2.21 | length 37.9
  Top Layer w0.254: U2.21 103.012,65.481 103.012,63.598 105.537,61.073 121.742,61.073 123.215,62.547 123.215,74.113 122.272,75.057 P5.9
PB11: P5.10 U2.22 | length 34.2
  Top Layer w0.254: U2.22 103.514,63.667 105.402,61.779 113.239,61.779 114.376,62.916 v1(114.376,66.091)
  Bottom Layer w0.254: v1(114.376,66.091) 114.376,75.717 116.256,77.597 P5.10
SCL: BME280.3 OLED.3 R6.2 U2.42 | length 52
  Top Layer w0.254: OLED.3 91.085,99.844 91.085,100.811 91.969,101.694 106.653,101.694 109.31,99.036 BME280.3 109.296,84.429 109.296,82.259 R6.2 109.865,82.245 110.501,81.609 110.501,81.086 107.452,78.037 106.667,78.037 104.759,76.129 103.101,76.129 102.014,75.042 U2.42
SDA: BME280.4 OLED.4 R7.2 U2.43 | length 43.4
  Top Layer w0.254: OLED.4 105.64,99.803 106.77,98.673 BME280.4 106.763,84.436 106.763,82.259 R7.2 102.528,82.251 101.514,81.238 U2.43
SWCLK: P1.3 U2.37 | length 41.9
  Top Layer w0.254: P1.3 79.869,43.775 79.869,48.069 98.155,66.356 98.669,66.356 98.848,66.535 101.266,66.535 102.752,68.021 102.752,72.332 102.901,72.481 103.112,72.481 ; 103.112,72.481 104.181,72.481 104.416,72.716 104.416,72.789 U2.37@104.512,72.885
SWDIO: P1.4 U2.34 | length 51.9
  Top Layer w0.254: P1.4 82.478,43.844 v1(82.478,46.04) ; U2.34 107.389,71.258 107.395,71.252 109.753,71.252 111.537,69.467 v1(111.537,69.465)
  Bottom Layer w0.254: v1(82.478,46.04) 82.478,46.315 92.818,56.655 104.855,56.655 112.17,63.97 112.17,68.66 111.537,69.292 v1(111.537,69.465)
pads on no net: Conn1.A2 Conn1.A3 Conn1.A6 Conn1.A7 Conn1.A8 Conn1.A10 Conn1.A11 Conn1.B2 Conn1.B3 Conn1.B6 Conn1.B7 Conn1.B8 Conn1.B10 Conn1.B11 Conn1.Hole1 Conn1.Hole2 Conn1.Shell1 Conn1.Shell2 Conn1.Shell3 Conn1.Shell4 U2.2 U2.3 U2.4 U2.25 U2.26 U2.27 U2.28 U2.31 U2.32 U2.33 U2.38

## Keep-outs
Keep-Out Layer:
  lines w0.5: 67.31,35.56 124.46,35.56 124.46,104.229 67.31,104.229 67.31,87.63 67.31,43.18 67.31,38.1 67.31,35.56

## Text inside footprints (layer, text, board x,y; h text height)
Conn1: Top Assembly "PCB Edge" at 99.998,38.195 h0.5